# Altium PCB Zotino.PCBDOC (part 10 of 10)
Units mm, origin at the board's own origin, x right, y up, seen from the top; angles counter-clockwise.
Board outline 160.1 x 100.1 mm, 4 copper layers (TopLayer, Internal Plane 2, Signal Layer 1, BottomLayer), stack 1.563 mm thick; 759 components, 378 nets, 2272 pads, 779 vias.
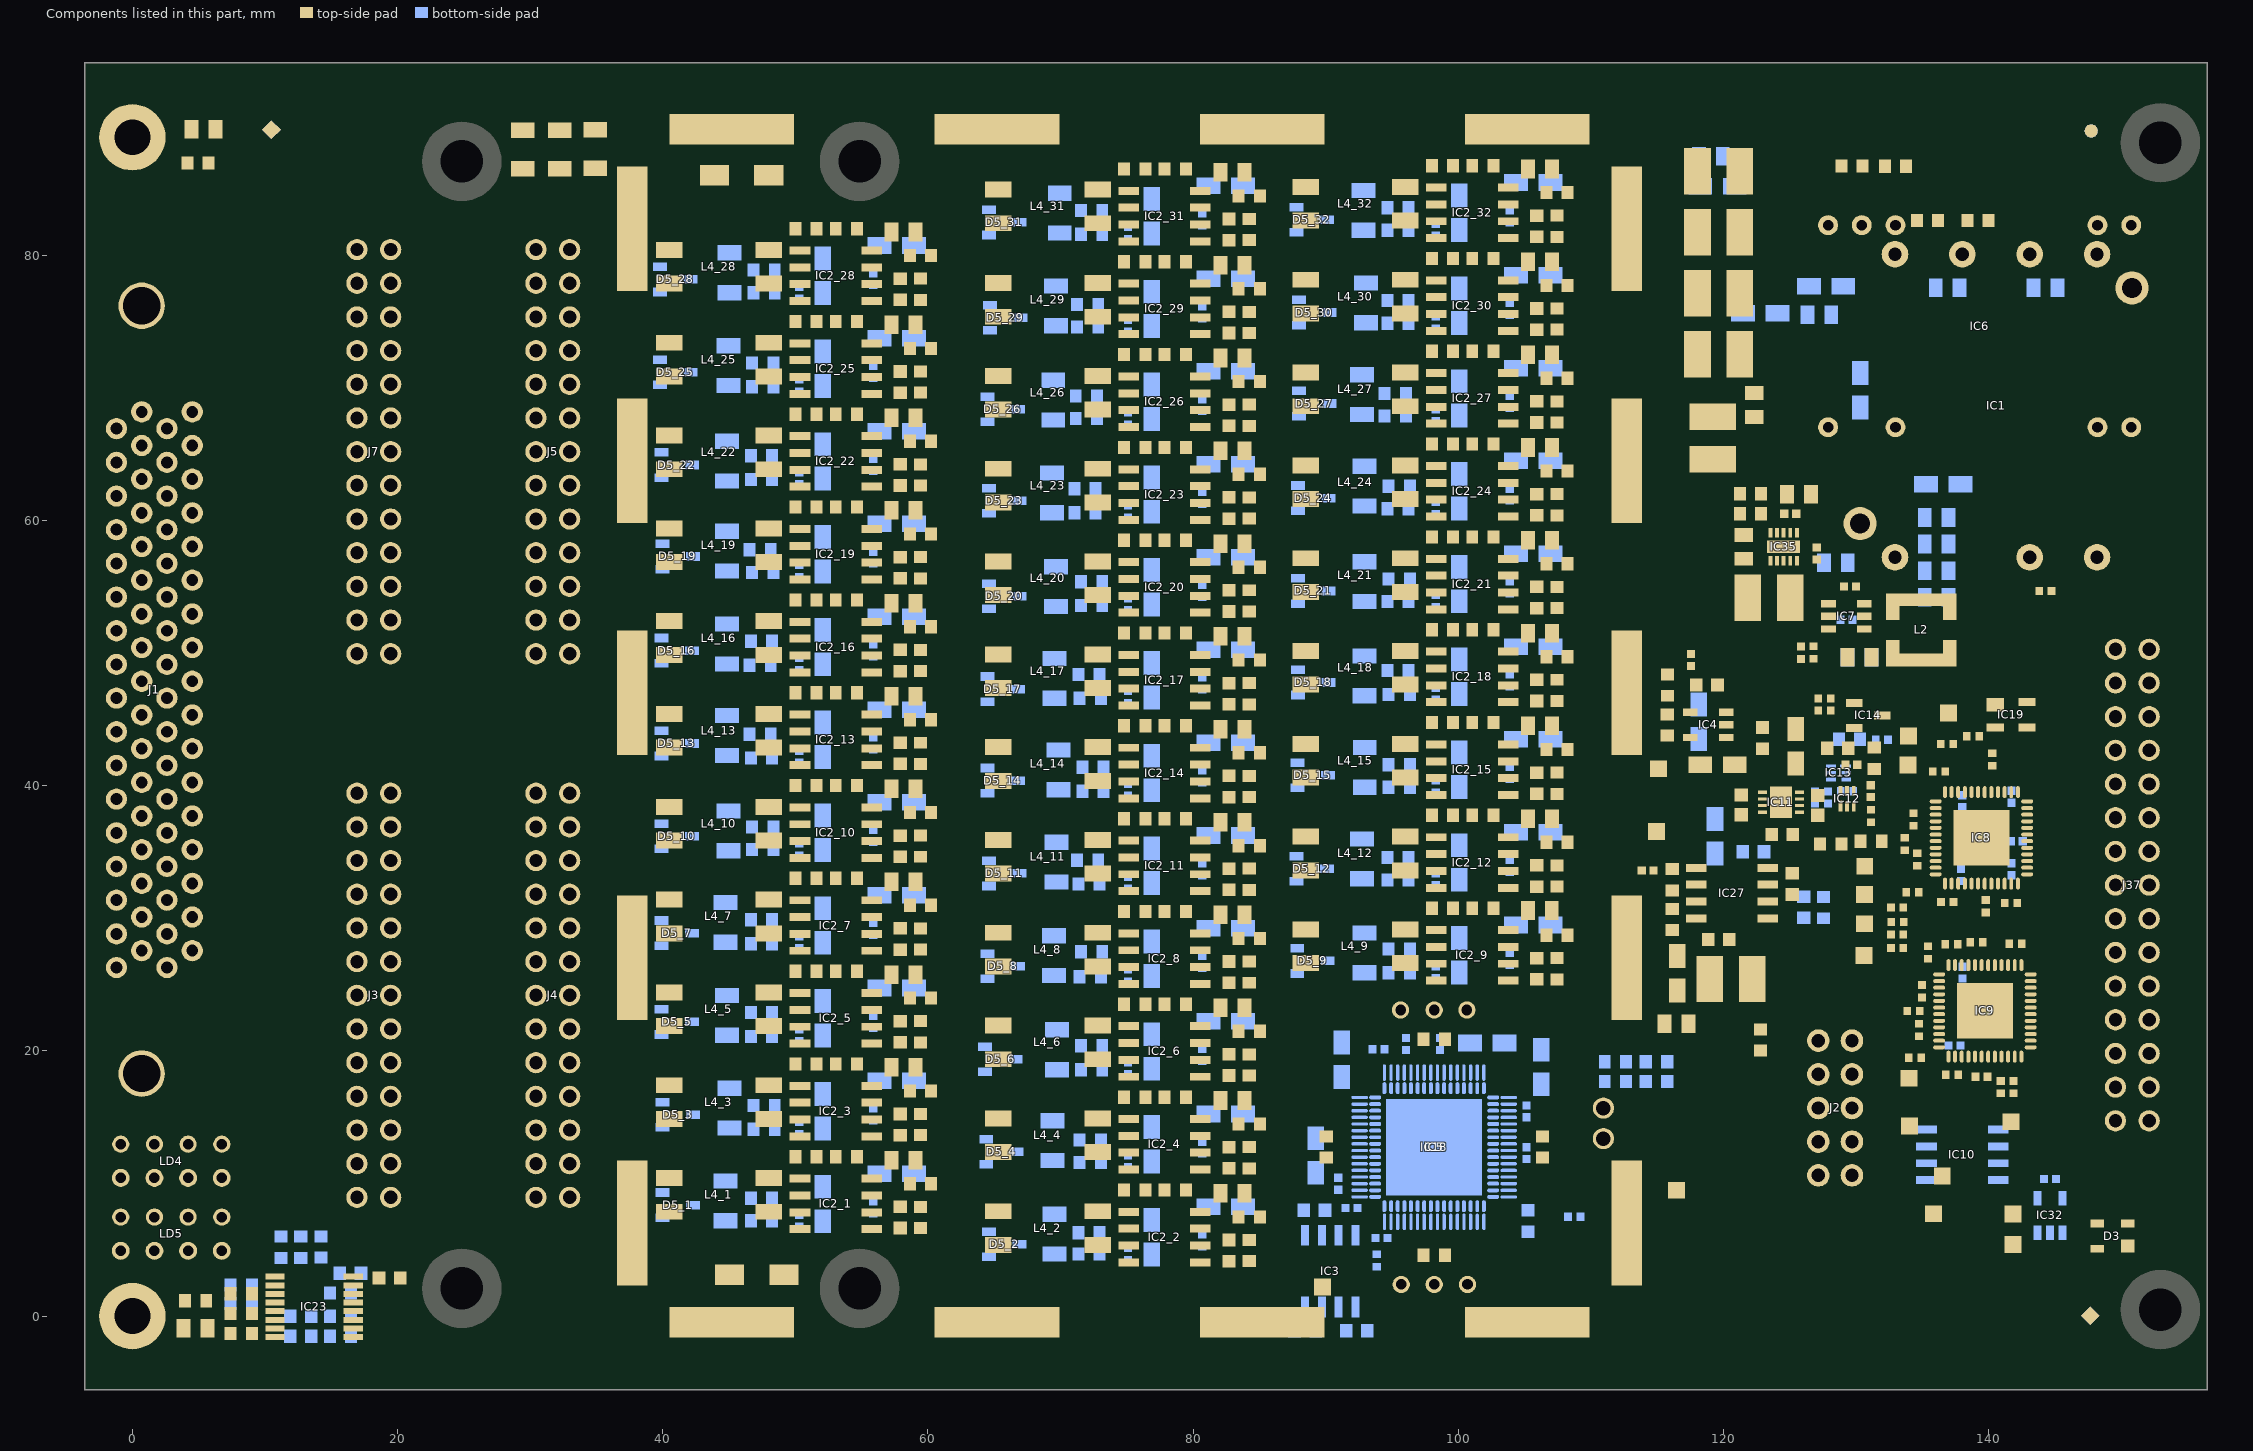
[diagram p10: the components of this part, seen from the top]

## Other copper (continued)
BottomLayer:
  rectangle net NetC3_2: 123.524,37.581 125.144,39.925
  rectangle net SENS1_2: 104.519,7.419 105.944,8.588
  rectangle net N12V0A: 84.444,9.488 85.076,14.388
  rectangle net SENS1_1: 104.519,5.788 105.919,7.188
  rectangle net GND: 16.944,3.988 17.389,5.008
  rectangle net GND: 114.666,21.91 115.123,22.368
  pour cut-out: 136.384,63.479 144.11,55.753 151.944,55.753 151.944,66.192 151.58,66.556 151.351,66.328 138.278,66.328
  pour cut-out: 103.944,20.488 104.444,20.488 104.444,21.863 104.36,21.948 103.944,21.948
  pour cut-out: 115.944,94.488 115.944,53.488 122.444,46.988 137.444,46.988 137.444,45.988 122.444,45.988 114.944,53.488 114.944,94.488
Internal Plane 2 (plane layer: these items are gaps in the copper):
  pour cut-out: 115.944,94.488 115.944,53.488 122.444,46.988 137.444,46.988 137.444,45.988 122.444,45.988 114.944,53.488 114.944,94.488
  lines w1: -3.606,-5.512 153.442,-5.512 153.444,-5.51 156.441,-5.51 156.489,-5.461

## Silkscreen, mask and mechanical layers (free items; w line width, h text height)
TopOverlay:
  drawing of 1240 lines, arcs and shapes, not listed
  text "Zotino v1.4.3" at 114.201,91.443 h2.03
  text "WUT ISE 2021" at 116.972,89.792 h1.02
  text "CH31" at 109.344,80.688 h1.02 r90
  text "CH30" at 85.944,80.088 h1.02 r90
  text "CH27" at 61.244,75.488 h1.02 r90
  text "CH29" at 109.113,73.352 h1.02 r90
  text "CH28" at 86.044,72.988 h1.02 r90
  text "CH24" at 61.244,68.588 h1.02 r90
  text "CH26" at 109.244,66.288 h1.02 r90
  text "CH25" at 86.044,65.988 h1.02 r90
  text "CH21" at 61.244,61.888 h1.02 r90
  text "CH23" at 109.244,59.288 h1.02 r90
  text "CH22" at 86.044,59.188 h1.02 r90
  text "EEM" at 152.355,55.956 h1.02
  text "CH18" at 61.244,54.734 h1.02 r90
  text "CH20" at 109.344,52.288 h1.02 r90
  text "CH19" at 86.044,51.988 h1.02 r90
  text "DAC OUT 24-31" at 12.798,50.415 h2.03 r90
  text "DAC OUT 16-23" at 25.904,49.439 h2.03 r90
  text "CH15" at 61.344,47.698 h1.02 r90
  text "RESETn" at 134.146,46.769 h1.02
  text "CH17" at 109.113,45.443 h1.02 r90
  text "CH16" at 86.044,45.188 h1.02 r90
  text "SDI" at 132.955,45.032 h1.02
  text "CH12" at 61.344,40.688 h1.02 r90
  text "SCKI" at 132.186,39.334 h1.02
  text "N12V0A" at 113.344,38.904 h1.02
  text "CH14" at 109.144,38.488 h1.02 r90
  text "CH13" at 86.044,38.088 h1.02 r90
  text "P12V0A" at 116.27,35.905 h1.02
  text "CH9" at 61.244,34.088 h1.02 r90
  text "GND" at 126.351,33.312 h1.02
  text "CH11" at 109.244,31.888 h1.02 r90
  text "CH10" at 85.944,31.188 h1.02 r90
  text "CSn" at 126.478,31.199 h1.02
  text "SDO" at 126.478,29.188 h1.02
  text "CH6" at 61.244,27.188 h1.02 r90
  text "LDACn" at 124.446,26.688 h1.02
  text "CH8" at 109.294,25.338 h1.02 r90
  text "CH7" at 86.044,24.688 h1.02 r90
  text "CH4" at 61.344,20.488 h1.02 r90
  text "CH5" at 86.044,17.688 h1.02 r90
  text "CLRn" at 135.27,16.624 h1.02
  text "TEC-" at 109.744,16.288 h1.52 r90
  text "BUSY" at 136.644,14.238 h1.02
  text "CH2" at 61.244,13.457 h1.02 r90
  text "CS_EXT" at 113.594,12.338 h1.02
  text "P3V3" at 133.113,12.059 h1.02
  text "CH3" at 86.044,10.788 h1.02 r90
  text "P3V3MP" at 137.786,10.524 h1.02
  text "DAC OUT 0-7" at 12.798,10.424 h2.03 r90
  text "DAC OUT 8-15" at 26.278,9.9 h2.03 r90
  text "2W max" at 123.769,8.063 h1.52 r90
  text "TEC+" at 109.944,7.488 h1.52 r90
  text "SDA" at 143.243,7.005 h1.02
  text "CH0" at 61.244,6.288 h1.02 r90
  text "GND" at 134.528,5.403 h1.02
  text "SCL" at 143.37,5.015 h1.02
  text "CH1" at 86.336,3.975 h1.02 r90
  text "REF" at 90.679,1.253 h1.02
  text "TEC controller" at 121.437,-3.073 h2 r90
BottomOverlay:
  drawing of 1237 lines, arcs and shapes, not listed
  text "Zotino v1.4.3" at 10.944,52.269 h2.03 r90
  text "WUT ISE 2021" at 13.405,48.488 h1.02 r90
TopSolder:
  rectangle: 91.944,19.572 96.926,20.247
  rectangle: 100.926,18.488 101.944,20.247
  rectangle: 102.444,18.288 104.444,18.888
  rectangle: 103.751,15.828 104.944,17.088
  rectangle: 103.751,17.088 105.685,18.288
  rectangle: 102.648,18.827 105.685,20.235
  rectangle: 105.104,11.588 105.628,15.988
  rectangle: 103.741,7.482 104.444,8.736
  rectangle: 102.194,7.292 104.444,7.538
  rectangle: 101.426,5.247 102.444,6.488
  rectangle: 96.444,5.496 100.567,6.642
  rectangle: 94.944,5.247 96.444,6.642
  rectangle: 93.118,5.663 95.694,7.094
  rectangle: 91.169,7.464 92.265,8.988
  rectangle: 90.685,5.247 94.044,7.988
  rectangle: 90.685,8.638 92.551,10.713
  rectangle: 90.678,14.706 92.265,15.688
  rectangle: 90.685,16.488 92.444,20.247
  rectangle: 93.444,18.688 98.078,19.988
  rectangle: 104.444,10.823 105.29,16.073
  rectangle: 102.735,8.736 104.444,16.488
  rectangle: 91.944,6.312 102.194,8.619
  rectangle: 91.944,8.619 102.944,18.76
BottomSolder:
  rectangle: 123.344,57.688 125.644,58.288
Mechanical1:
  drawing of 317 lines, arcs and shapes, not listed
  text "Layer" at 17.088,149.857 h1.52
  text "Name" at 27.5,149.857 h1.52
  text "Material" at 53.909,149.857 h1.52
  text "Thickness" at 75.747,149.857 h1.52
  text "Constant" at 92.253,149.857 h1.52
  text "Board Layer Stack" at 106.727,149.857 h1.52
  text "TopOverlay" at 27.5,146.809 h1.52
  text "TopSolder" at 27.5,143.761 h1.52
  text "Solder Resist" at 53.909,143.761 h1.52
  text "0.40mil" at 75.747,143.761 h1.52
  text "3.5" at 92.253,143.761 h1.52
  text "1" at 17.088,140.713 h1.52
  text "TopLayer" at 27.5,140.713 h1.52
  text "1.40mil" at 75.747,140.713 h1.52
  text "Dielectric1" at 27.5,137.665 h1.52
  text "FR-4" at 53.909,137.665 h1.52
  text "14.17mil" at 75.747,137.665 h1.52
  text "4.8" at 92.253,137.665 h1.52
  text "2" at 17.088,134.617 h1.52
  text "Internal Plane 2" at 27.5,134.617 h1.52
  text "1.42mil" at 75.747,134.617 h1.52
  text "Dielectric 3" at 27.5,131.569 h1.52
  text "27.56mil" at 75.747,131.569 h1.52
  text "4.2" at 92.253,131.569 h1.52
  text "3" at 17.088,128.521 h1.52
  text "Signal Layer 1" at 27.5,128.521 h1.52
  text "1.42mil" at 75.747,128.521 h1.52
  text "Dielectric 5" at 27.5,125.473 h1.52
  text "14.17mil" at 75.747,125.473 h1.52
  text "4.2" at 92.253,125.473 h1.52
  text "4" at 17.088,122.425 h1.52
  text "BottomLayer" at 27.5,122.425 h1.52
  text "1.40mil" at 75.747,122.425 h1.52
  text "BottomSolder" at 27.5,119.377 h1.52
  text "Solder Resist" at 53.909,119.377 h1.52
  text "0.40mil" at 75.747,119.377 h1.52
  text "3.5" at 92.253,119.377 h1.52
  text "BottomOverlay" at 27.5,116.329 h1.52
Mechanical4:
  lines w0.508: -6.1,-20.762 -6.1,108.65
  lines w1: 37.707,-0.481 37.707,89.519 112.707,89.519 112.707,-0.481 37.707,-0.481 ; 118.707,49.519 153.707,49.519 153.707,89.519 118.707,89.519 118.707,49.519
Mechanical8:
  lines w0.2: 88.185,12.747 98.181,12.747 ; 98.144,12.747 107.885,12.747 ; 98.181,-0.549 98.181,12.747 ; 98.181,24.478 98.181,12.747

## Text inside footprints (layer, text, board x,y; h text height)
IC6: TopOverlay "2" at 151.147,80.877 h1.2 r180; TopOverlay "11" at 128.47,80.877 h1.2 r180; TopOverlay "14" at 128.755,69.637 h1.2 r180; TopOverlay "23" at 151.681,69.637 h1.2 r180
J1: TopOverlay "33" at 2.044,70.899 h1 r270; TopOverlay "68" at 0.044,71.499 h1 r270; TopOverlay "67" at -1.706,70.599 h1 r270; TopOverlay "34" at 3.994,71.699 h1 r270; TopOverlay "35" at -1.841,24.849 h1 r270; TopOverlay "2" at 4.059,25.749 h1 r270; TopOverlay "1" at 2.109,24.849 h1 r270; TopOverlay "36" at 0.309,25.749 h1 r270; Mechanical14 "33" at 2.044,70.899 h1.02 r270; Mechanical14 "68" at 0.044,71.499 h1.02 r270; Mechanical14 "67" at -1.706,70.599 h1.02 r270; Mechanical14 "34" at 3.994,71.699 h1.02 r270; Mechanical14 "35" at -1.841,24.849 h1.02 r270; Mechanical14 "2" at 4.059,25.749 h1.02 r270; Mechanical14 "1" at 2.109,24.849 h1.02 r270; Mechanical14 "36" at 0.309,25.749 h1.02 r270; Mechanical8 "PCB Edge" at -4.546,51.569 h1.2 r270
J2: TopOverlay "10" at 130.957,11.251 h1 r270; Mechanical14 "10" at 130.957,11.251 h1 r270
J3: TopOverlay "26" at 15.539,38.799 h1.02 r90; Mechanical14 "26" at 15.539,38.799 h1.02 r90
J4: TopOverlay "26" at 29.039,38.799 h1.02 r90; Mechanical14 "26" at 29.039,38.799 h1.02 r90
J5: TopOverlay "26" at 29.039,79.799 h1.02 r90; Mechanical14 "26" at 29.039,79.799 h1.02 r90
J7: TopOverlay "26" at 15.539,79.799 h1.02 r90; Mechanical14 "26" at 15.539,79.799 h1.02 r90
J37: TopOverlay "30" at 153.498,15.364 h1.02 r270; Mechanical14 "30" at 153.498,15.364 h1.02 r270
LD4: TopOverlay "C" at 8.012,10.043 h1; TopOverlay "A" at 8.012,12.583 h1; TopOverlay "A" at -1.659,11.363 h1 r90; TopOverlay "B" at 0.881,11.363 h1 r90; TopOverlay "C" at 3.421,11.363 h1 r90; TopOverlay "D" at 5.961,11.363 h1 r90; Mechanical14 "A" at 8.012,12.583 h1; Mechanical14 "C" at 8.012,10.043 h1; Mechanical14 "A" at -1.659,11.363 h1 r90; Mechanical14 "B" at 0.881,11.363 h1 r90; Mechanical14 "C" at 3.421,11.363 h1 r90; Mechanical14 "D" at 5.961,11.363 h1 r90
LD5: TopOverlay "C" at 8.012,4.543 h1; TopOverlay "A" at 8.012,7.083 h1; TopOverlay "A" at -1.659,5.863 h1 r90; TopOverlay "B" at 0.881,5.863 h1 r90; TopOverlay "C" at 3.421,5.863 h1 r90; TopOverlay "D" at 5.961,5.863 h1 r90; Mechanical14 "A" at 8.012,7.083 h1; Mechanical14 "C" at 8.012,4.543 h1; Mechanical14 "A" at -1.659,5.863 h1 r90; Mechanical14 "B" at 0.881,5.863 h1 r90; Mechanical14 "C" at 3.421,5.863 h1 r90; Mechanical14 "D" at 5.961,5.863 h1 r90